# Altium PCB board.PcbDoc
Units mm, origin at the board's own origin, x right, y up, seen from the top; angles counter-clockwise.
Board outline 50 x 97 mm, 2 copper layers (Top Layer, Bottom Layer), stack 1.57 mm thick; 86 components, 61 nets, 299 pads, 30 vias.
Unrouted connection lines stored in the file: 2.
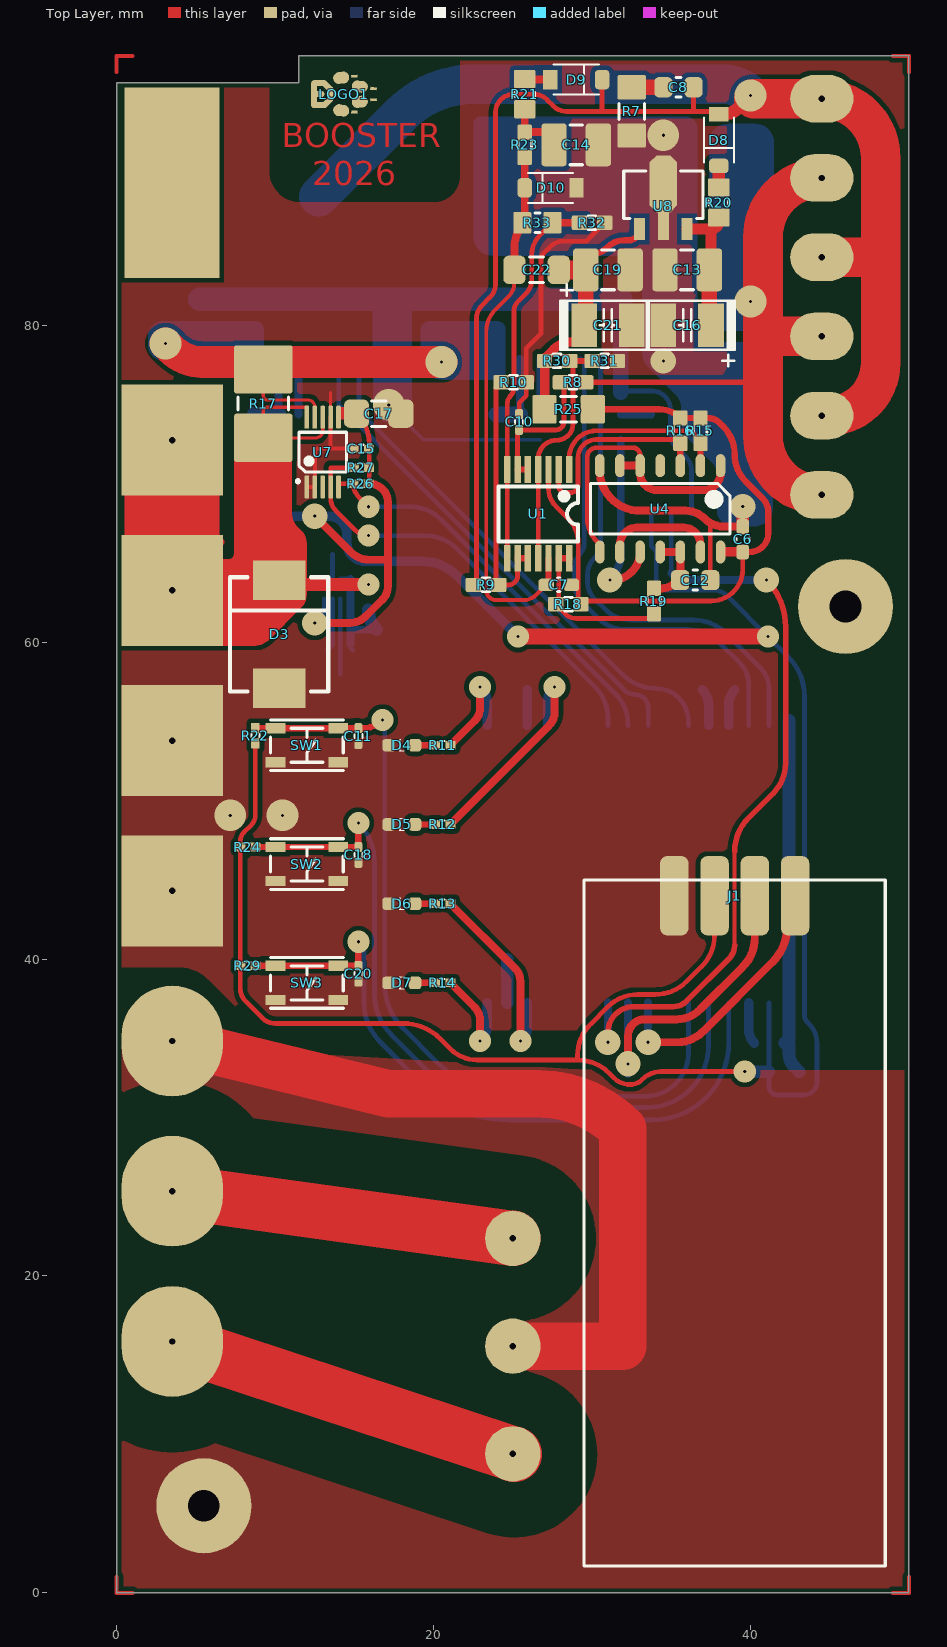
[diagram p0: Top Layer view]
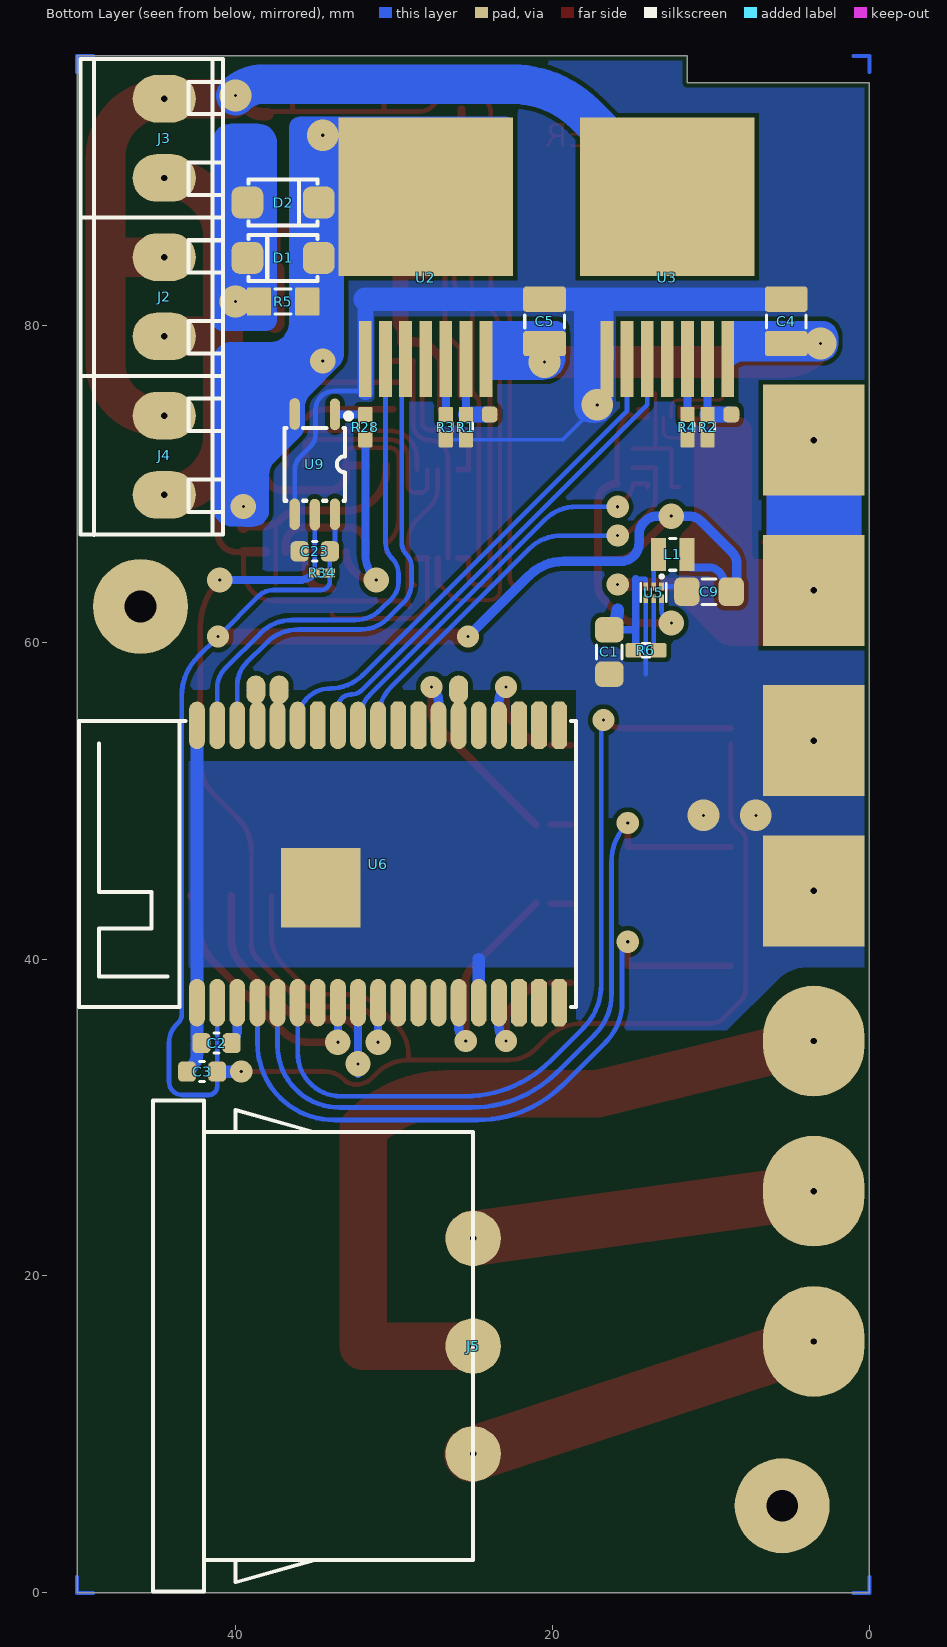
[diagram p1: Bottom Layer view, seen from below]
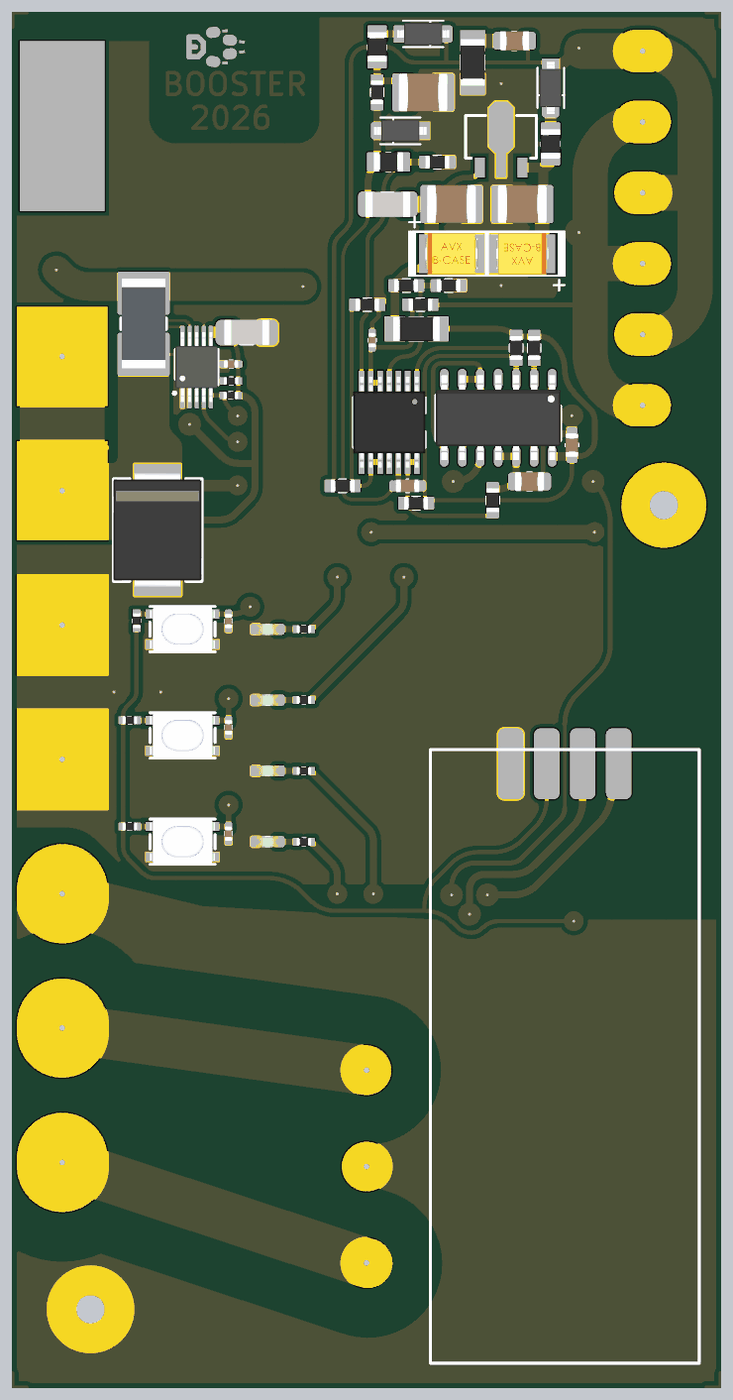
[diagram p2: 3D render of the assembled board from above, using the file's embedded part models]
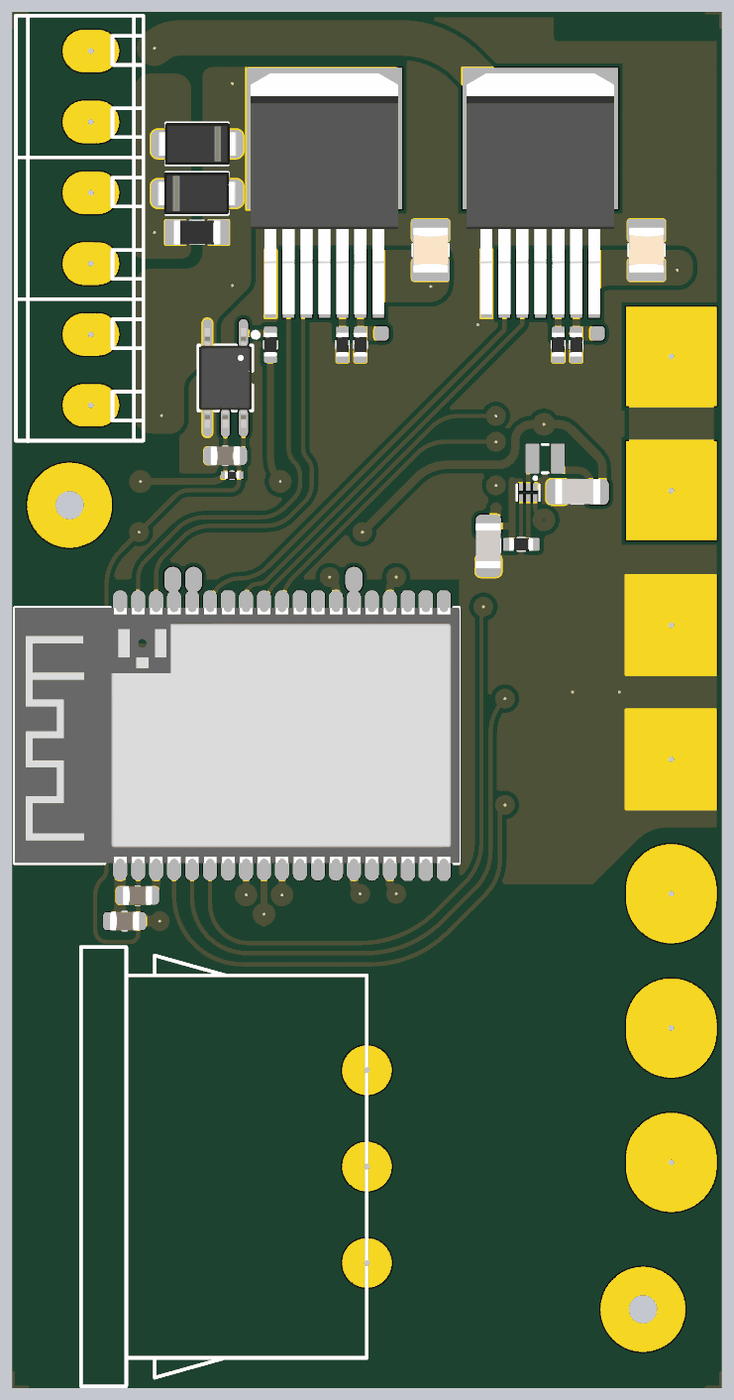
[diagram p3: 3D render of the assembled board from below, using the file's embedded part models]

## Layer stack, top to bottom
Top Solder: solder mask 0.0127, Solder Resist, Dk 3.8
Top Layer: signal copper 0.035
Dielectric: core 1.5, FR-4, Dk 4.5
Bottom Layer: signal copper 0.035
Bottom Solder: solder mask 0.0127, Solder Resist, Dk 3.8

## Board outline
0,0 50,0 50,97 11.5,97 11.5,95.3 0,95.3

## Design rules (kind name [scope] priority, off if disabled: settings)
AcuteAngle [All] p1: minimum=6.00000000000000E+0001 checktracksonly=FALSE
BoardOutlineClearance BoardOutlineClearance_1 [OnLayer('Top Overlay')    or OnLayer('Bottom Overlay')] p1: gap=0 ignorepadtopadclearanceinfootprint=FALSE
BoardOutlineClearance [All] p2: gap=0.3 ignorepadtopadclearanceinfootprint=FALSE
Clearance [InNet('L') or InNet('N')] p1: gap=2 ignorepadtopadclearanceinfootprint=FALSE except(3.5: Arc-Fill Arc-Poly Arc-Region Track-Fill Track-Poly Track-Region SMDPad-Fill SMDPad-Poly SMDPad-Region THPad-Fill THPad-Poly THPad-Region Via-Fill Via-Poly Via-Region Fill-Fill Fill-Poly Fill-Region Poly-Poly Poly-Region Region-Region)
Clearance Clearance_1 [All] p2: gap=0.3 ignorepadtopadclearanceinfootprint=FALSE except(0.13: Arc-Arc Arc-Track Arc-SMDPad Arc-Via Track-Track Track-SMDPad Track-Via SMDPad-SMDPad SMDPad-Via THPad-Via Via-Via; 0.15: Arc-THPad Arc-Text Arc-Hole Track-THPad Track-Text Track-Hole SMDPad-THPad SMDPad-Text SMDPad-Hole THPad-THPad THPad-Text THPad-Hole Via-Text Via-Hole Fill-Text Fill-Hole Poly-Text Poly-Hole Region-Text Region-Hole Text-Text Text-Hole)
ComponentClearance ComponentClearance_2 [HasFootprint('CONN-TH_XY300V-A-5.0-2P')] p1: gap=-1 collisioncheckmode=3 verticalgap=2540 showdistances=FALSE
ComponentClearance ComponentClearance_1 [IsFree] p2: gap=-1 collisioncheckmode=3 verticalgap=2540 showdistances=FALSE
ComponentClearance [All] p3: gap=0.3 collisioncheckmode=3 verticalgap=0.254 showdistances=FALSE donotcheckwithout3dbody=TRUE
Height Height_1 [HasFootprint('GME64128-02')] p1: minheight=0 maxheight=25.4 prefheight=12.7
Height [InComponentClass('Top Side Components')] p2: minheight=0 maxheight=4.36 prefheight=1
HoleSize [All] p1: absolutevalues=TRUE maxlimit=6 minlimit=0.2 maxpercent=80.000 minpercent=20.000
HoleToHoleClearance HoleToHoleClearance_1 [IsVia vs IsThruPin] p1: gap=0.7 allowstackedmicrovias=TRUE
HoleToHoleClearance [All] p2: gap=0.5 allowstackedmicrovias=TRUE
MinimumSolderMaskSliver [All] p1 off: minsoldermaskwidth=0.254
PlaneClearance [All] p1: clearance=0.45
PlaneConnect [All] p1: planeconnectstyle=Direct reliefexpansion=0.3 reliefentries=4 reliefconductorwidth=0.381 reliefairgap=0.178
PolygonConnect [All] p1: connectstyle=Direct reliefconductorwidth=0.381 reliefentries=4 polygonreliefangle="90 Angle" airgapwidth=0.356
RoutingVias [All] p1: holewidth=0.2 width=1.6 viastyle="Through Hole" minholewidth=0.2 minwidth=0.2 maxholewidth=3 maxwidth=3
SilkToSilkClearance [All] p1 off: silktosilkclearance=0.254
SilkToSolderMaskClearance [IsPad] p1 off: minsilkscreentomaskgap=0.254 clearancetoexposedcopper=TRUE
SolderMaskExpansion [All] p1: expansion=0.102 istentingtop=FALSE
SupplyNets "Schematic Supply Nets_10" [InNet('Vin0')] p1: voltage=0.000
SupplyNets "Schematic Supply Nets_9" [InNet('VGND')] p2: voltage=0.000
SupplyNets "Schematic Supply Nets_8" [InNet('OUT1')] p3: voltage=0.000
SupplyNets "Schematic Supply Nets_7" [InNet('+18mV')] p4: voltage=0.000
SupplyNets "Schematic Supply Nets_6" [InNet('V5V')] p5: voltage=0.000
SupplyNets "Schematic Supply Nets_5" [InNet('-18mV')] p6: voltage=0.000
SupplyNets "Schematic Supply Nets_4" [InNet('OUT2')] p7: voltage=0.000
SupplyNets "Schematic Supply Nets_2" [InNet('VNEG')] p8: voltage=0.000
SupplyNets "Schematic Supply Nets_3" [InNet('3V3')] p9: voltage=0.000
SupplyNets "Schematic Supply Nets_1" [InNet('GND')] p10: voltage=0.000
SupplyNets "Schematic Supply Nets" [InNet('Vin')] p11: voltage=0.000
UnRoutedNet [All] p1: checkbadconnections=TRUE
Width [All] p1: maxlimit=10 minlimit=0.15 preferedwidth=0.254
20 further rules are at their usual default settings.

## Classes and differential pairs
component class board: C1 C2 C3 C4 C5 C6 C7 C8 C9 C10 C11 C12 C13 C14 C15 C16 C18 C23 D1 D2 D3 D4 D5 D6 D7 D8 D9 D10 J1 J2 J3 J4 J5 L1 LOGO1 R1 R2 R3 R4 R5 R6 R7 R8 R9 R10 R11 R12 R13 R14 R15 R16 R17 R18 R19 R20 R21 R22 R23 R24 R25 R26 R27 R28 R29 R30 R31 R32 R33 R34 SW1 SW2 SW3 U1 U2 U3 U4 U5 U6 U7 U8 U9

## Components (designator, comment, footprint, x,y, rotation, side; value= is the part's Value field where it differs from the comment)
C1 "10uF" C1206#1 16.408,59.385 r90 bottom
C2 "1uF" C0805 41.2,34.7 r180 bottom
C3 "10uF" C0805 42.112,32.9 r180 bottom
C4 "4n7" C1210-2.5MM 5.25,80.25 r90 bottom
C5 "4n7" C1210-2.5MM 20.5,80.25 r90 bottom
C6 "100nF" C0603 39.507,66.494 r90 top
C7 "100nF" C0603 27.9,63.614 r180 top
C8 "10nF" C0805 35.452,95.024 r180 top
C9 "10uF" C1206#1 10.114,63.19 r180 bottom
C10 "100pF" C0402 25.4,73.9 r90 top
C11 "100nF" C0402 15.25,54.075 r270 top
C12 "1nF" C0805 36.509,63.923 r0 top
C13 "2u" C1210-1.8MM 36,83.5 r180 top
C14 "2u" C1210-1.8MM 29,91.388 r180 top
C15 "100nF" C0402 15.434,72.212 r180 top
C16 "2u" C3528 36,80 r180 top
C17 "100u" C1206#1 16.535,74.427 r0 top
C18 "100nF" C0402 15.25,46.575 r270 top
C19 "10u" C1210-1.8MM 31,83.5 r0 top
C20 "100nF" C0402 15.25,39.075 r270 top
C21 "2u" C3528 31,80 r0 top
C22 "10u" C1206#2 26.5,83.5 r180 top
C23 "10u" C0805 35,65.738 r0 bottom
D1 "SS36" SMA 37,84.25 r0 bottom
D2 "SS36" SMA 37,87.75 r180 bottom
D3 "" SMC 10.25,60.5 r270 top
D4 "GRN" LED-0603-GRN 18,53.5 r0 top
D5 "GRN" LED-0603-GRN 18,48.5 r0 top
D6 "GRN" LED-0603-GRN 18,43.5 r0 top
D7 "GRN" LED-0603-GRN 18,38.5 r0 top
D8 "1N4148WS" SOD-123 38,91.696 r90 top
D9 "1N4148WS" SOD-123 29,95.504 r180 top
D10 "1N4148WS" SOD-123 27.385,88.678 r0 top
J1 "OLED" GME64128-02 39,44 r0 top locked
J2 "" CONN-TH_XY300V-A-5.0-2P 44.5,81.8 r270 bottom
J3 "" CONN-TH_XY300V-A-5.0-2P 44.5,91.8 r270 bottom
J4 "" CONN-TH_XY300V-A-5.0-2P 44.5,71.8 r270 bottom
J5 "220V" AS-24 25,15.575 r0 bottom
L1 "33uH" L2520 12.409,65.537 r180 bottom
LOGO1 "LOGO" LOGO 12.465,94.59 r270 top
R1 "" R0603 25.46,73.577 r90 bottom
R2 "" R0603 10.21,73.577 r90 bottom
R3 "" R0603 26.73,73.577 r90 bottom
R4 "" R0603 11.48,73.577 r90 bottom
R5 "1.8" R1206 37,81.5 r0 bottom
R6 "0" R0603 14.097,59.487 r180 bottom
R7 "3.3" R1206 32.5,93.5 r270 top
R8 "100" R0603 28.801,76.4 r0 top
R9 "100k" R0603 23.308,63.614 r0 top
R10 "1k" R0603 25.05,76.4 r0 top
R11 "470" R0402 20.576,53.5 r0 top
R12 "470" R0402 20.576,48.5 r0 top
R13 "470" R0402 20.576,43.5 r0 top
R14 "470" R0402 20.576,38.5 r0 top
R15 "10k" R0603 36.84,73.35 r270 top
R16 "10k" R0603 35.57,73.35 r270 top
R17 "" R2512-WIDE 9.25,75.057 r270 top
R18 "10k" R0603 28.5,62.4 r180 top
R19 "470" R0603 33.907,62.6 r270 top
R20 "33" R0805 38,87.75 r270 top
R21 "220" R0805 25.75,94.59 r270 top
R22 "2k2" R0402 8.75,54.099 r270 top
R23 "220" R0603 25.75,91.388 r270 top
R24 "2k2" R0402 8.274,47.075 r180 top
R25 "0" R1206 28.524,74.7 r180 top
R26 "2k2" R0402 15.408,70.002 r0 top
R27 "2k2" R0402 15.434,71.018 r0 top
R28 "220" R0603 31.81,73.577 r270 bottom
R29 "2k2" R0402 8.274,39.575 r180 top
R30 "270k" R0603 27.8,77.749 r180 top
R31 "1k" R0603 30.8,77.749 r0 top
R32 "820" R0603 30,86.475 r0 top
R33 "33k" R0805 26.55,86.475 r180 top
R34 "1k" R0402 34.524,64.371 r0 bottom
SW1 "PTS810SJS250" BTN_PTS810 12,53.5 r0 top
SW2 "PTS810SJS250" BTN_PTS810 12,46 r0 top
SW3 "PTS810SJS250" BTN_PTS810 12,38.5 r0 top
U1 "LM2901YPT" TSSOP-14_L5.0-W4.4-P0.65-LS6.4-BL 26.6,68.1 r180 top
U2 "BTN8982TA" TO-263-7_L10.2-W10.4-P1.27-LS14.4-TL 28,83 r90 bottom
U3 "BTN8982TA" TO-263-7_L10.2-W10.4-P1.27-LS14.4-TL 12.75,83 r90 bottom
U4 "MC74HC02ADG" SOIC-14 34.3,68.419 r180 top value=MC74HC02
U5 "TPS62237" SON-6_L1.5-W1.0-P0.50-BL 13.614,63.135 r0 bottom
U6 "ESP32-WROVER-E-N16R8" WIFIM-SMD_39P-L31.4-W18.0-P1.27_2 31,46 r90 bottom
U7 "INA226AIDGSR" "VSSOP-10 (3x3x0.5)" 13,72 r0 top
U8 "7805" SOT-89 34.5,87.5 r0 top
U9 "TLP2362(TPL,E" OPTO-SMD-5_L3.7-W4.6-P1.27-LS7.0-BR 35,71.228 r90 bottom

## Footprints (in the part's own frame and the unit in brackets; to place one, negate y for a bottom-side part, rotate by r counter-clockwise, add the part's x,y. Pads: shape width x height; smd on the part's side, far side on the other; paste and mask are expansions set on the pad)
AS-24 [mm]
  round 3.5 hole 0.4: 1(0,6.8) 2(0,0) 3(0,-6.8)
  silkscreen extent 0,-15.5 20.2,15.5, body extent 0,-15.5 20.2,15.5, height 20
BTN_PTS810 [mm]
  rect 1.25x0.65 smd mask+0.05: 1(-1.975,1.075) 2(1.975,1.075) 3(-1.975,-1.075) 4(1.975,-1.075)
  silkscreen extent -2.3,-1.6 2.3,1.6, body extent -2.3,-1.6 2.3,1.6, height 2.5
C0402 [mm] "Chip Capacitor Body"
  rrect50% 0.635x0.508 smd mask+0.05: 1(-0.5,0) 2(0.5,0)
  silkscreen extent -0.13,-0.25 0.13,0.25, body extent -0.52,-0.27 0.53,0.28, height 0.55
C0603 [mil] "Chip Capacitor"
  rrect50% 38x31 smd mask+1.97: 1(-31.5,0) 2(31.5,0)
  silkscreen extent -3,-17 3,17, body extent -33,-18 33,18, height 35
C0805 [mil] "Chip Capacitor"
  rrect50% 45x50 smd mask+1.97: 1(-37.5,0) 2(37.5,0)
  silkscreen extent -6,-25 6,25, body extent -41,-27 41,27, height 53
C1206#1 [mm] "Chip Capacitor"
  rrect50% 1.6x1.8 smd: 1(-1.4,0) 2(1.4,0)
  silkscreen extent -0.45,-0.8 0.45,0.8, body extent -1.6,-0.88 1.6,0.92, height 1.6
C1206#2 [mm] "Chip Capacitor"
  rrect50% 1.4x1.8 smd: 1(-1.4,0) 2(1.4,0)
  silkscreen extent -0.45,-0.8 0.45,0.8, body extent -1.6,-0.88 1.6,0.92, height 1.6
C1210-1.8MM [mm] "Chip Capacitor"
  rrect25% 1.6x2.7 smd mask+0.05: 1(-1.4,0) 2(1.4,0)
  silkscreen extent -0.4,-1.25 0.4,1.25, body extent -1.75,-1.35 1.75,1.35, height 1.8
C1210-2.5MM [mm] "Chip Capacitor"
  rrect25% 1.6x2.7 smd mask+0.05: 1(-1.4,0) 2(1.4,0)
  silkscreen extent -0.4,-1.25 0.4,1.25, body extent -1.6,-1.25 1.6,1.25, height 2.52
C3528 [mil] "C3528_1"
  rect 64x108 smd: 1(-59.06,0) 2(59.06,0)
  silkscreen extent -118,-61 101,102, body extent -73,-58 73,58, height 80
CONN-TH_XY300V-A-5.0-2P [mm]
  oval 3x4 hole 0.4: 1(-2.5,0) 2(2.5,0)
  silkscreen extent -5,-5.3 5.05,3.7, body extent -5,-5.3 5,3.7, height 12.5
GME64128-02 [mm]
  rrect50% 1.8x5 smd: 1(-3.81,0) 2(-1.27,0) 3(1.27,0) 4(3.81,0)
  silkscreen extent -9.5,-42.3 9.5,1, body extent -9.5,-42.3 9.5,1, height 5.27
L2520 [mm] "Chip Inductor"
  rrect10% 0.95x2.1 smd mask+0.05: 1(-0.9,0) 2(0.9,0)
  silkscreen extent -0.2,-1 0.2,1, body extent -1.25,-1 1.25,1, height 0.9
LED-0603-GRN [mm]
  rrect50% 0.8x0.8 smd mask+0.05: 1(0.825,0) 2(-0.825,0)
  silkscreen extent -0.18,-0.4 0.2,0.4, body extent -0.8,-0.4 0.8,0.4, height 0.6
LOGO [mil]
  rect 15.75x7.87 smd rot 93 mask+4: ""(-44.55,100)
  oval 30x40 smd rot 8 mask+4: ""(-40.55,67)
  oval 15x39.5 smd mask+4: ""(-27.5,12.5) ""(27.5,12.5)
  oval 15x36.21 smd rot 135 mask+4: ""(-20,32.5)
  oval 30x40 smd rot 173 mask+4: ""(-18.99,113.27)
  rect 15.75x7.87 smd rot 83 mask+4: ""(-13.91,147.15)
  oval 39.5x15 smd mask+4: ""(0,40)
  oval 15x32.5 smd mask+4: ""(0,9)
  oval 70x15 smd mask+4: ""(0,0)
  rect 15.75x7.87 smd rot 97 mask+4: ""(13.91,147.15)
  oval 30x40 smd rot 7 mask+4: ""(18.99,113.27)
  oval 15x36.21 smd rot 45 mask+4: ""(20,32.5)
  oval 30x40 smd rot 172 mask+4: ""(40.55,67)
  rect 15.75x7.87 smd rot 87 mask+4: ""(44.55,100)
OPTO-SMD-5_L3.7-W4.6-P1.27-LS7.0-BR [mm]
  oval 2x0.65 smd: 1(3.15,-1.27) 3(3.175,1.27) 4(-3.15,1.27) 5(-3.175,0) 6(-3.15,-1.27)
  silkscreen extent -2.3,-2.29 3.2,1.9, body extent -3.5,-1.85 3.5,1.85, height 2.2
R0402 [mm]
  rrect10% 0.635x0.55 smd mask+0.05: 1(-0.476,0) 2(0.476,0)
  silkscreen extent -0.12,-0.25 0.13,0.25, body extent -0.52,-0.27 0.53,0.28, height 0.4
R0603 [mil] "Chip Resistor; Body 1.6 x 0.8 mm (LxW typ)"
  rrect20% 38x35.43 smd mask+1.97: 1(-31.5,0) 2(31.5,0)
  silkscreen extent -10,-17 10,17, body extent -33,-18 33,18, height 22
R0805 [mil] "Chip Resistor; Body 1.6 x 0.8 mm (LxW typ)"
  rrect15% 45x53.15 smd: 1(-37.5,0) 2(37.5,0)
  silkscreen extent -6,-25 6,25, body extent -41,-27 41,27, height 24
R1206 [mil] "Chip Resistor"
  rrect10% 60x70 smd mask+1.97: 1(-60,0) 2(60,0)
  silkscreen extent -20,-31 20,31, body extent -65,-33 65,33, height 26
R2512-WIDE [mm] "Chip Resistor; Body 6.4 x 3.2 mm (LxW typ)"
  rrect10% 3.05x3.68 smd mask+0.05: 1(-2.16,0) 2(2.16,0)
  silkscreen extent -0.4,-1.6 0.4,1.6, body extent -3.19,-1.55 3.16,1.55, height 0.55
SMA [mm] "SMA(DO-214AC)"
  rrect50% 2x2 smd: 1(-2.25,0) 2(2.25,0)
  silkscreen extent -2.17,-1.45 2.17,1.45, body extent -2.78,-1.48 2.83,1.48, height 2.9
SMC [mm]
  rect 2.5x3.3 smd: 1(3.4,0) 2(-3.4,0)
  silkscreen extent -3.6,-3.1 3.6,3.1, body extent -4.07,-3.15 4.08,3.1, height 2.65
SOD-123 [mm]
  rect 0.91x1.22 smd mask+0.05: 1(1.635,0)
  rrect50% 0.91x1.22 smd mask+0.05: 2(-1.635,0)
  silkscreen extent -1.43,-0.95 1.43,0.92, body extent -1.85,-0.77 1.85,0.77, height 1.44
SOIC-14 [mm]
  oval 0.6x1.45 smd: 1(-3.81,-2.725) 2(-2.54,-2.725) 3(-1.27,-2.725) 4(0,-2.725) 5(1.27,-2.725) 6(2.54,-2.725) 7(3.81,-2.725) 8(3.81,2.725) 9(2.54,2.725) 10(1.27,2.725) 11(0,2.725) 12(-1.27,2.725) 13(-2.54,2.725) 14(-3.81,2.725)
  silkscreen extent -4.4,-1.6 4.4,1.6, body extent -4.4,-3 4.4,3, height 1.75
SON-6_L1.5-W1.0-P0.50-BL [mm]
  rect 0.3x0.52 smd: 1(-0.5,-0.385) 2(0,-0.385) 3(0.5,-0.385) 4(0.5,0.385) 5(0,0.385) 6(-0.5,0.385)
  silkscreen extent -0.8,-1.12 0.8,0.58
SOT-89 [mm] "SOT-89; Body 4.7 x 4.5 mm, inc. leads (LxW max)"
  rect 0.7x1.4 smd: 1(-1.5,-1.425) 3(1.5,-1.425)
  rect 0.7x1.75 smd: 2(0,-1.25)
  oct 1.75x3.6 smd: 2(0,1.425)
  silkscreen extent -2.5,-0.75 2.5,2.25, body extent -2.25,-0.6 2.25,1.85, height 1.5
TO-263-7_L10.2-W10.4-P1.27-LS14.4-TL [mm]
  rect 4.8x0.8 smd: 1(-5.123,3.81) 2(-5.123,2.54) 3(-5.123,1.27) 4(-5.123,0) 5(-5.123,-1.27) 6(-5.123,-2.54) 7(-5.123,-3.81)
  rect 10x11 smd: 8(5.123,0)
  body extent -7.26,-5.21 9.71,5.21, height 5.28
TSSOP-14_L5.0-W4.4-P0.65-LS6.4-BL [mm]
  rect 0.4x1.7 smd: 1(-1.95,-2.8) 2(-1.3,-2.8) 3(-0.65,-2.8) 4(0,-2.8) 5(0.65,-2.8) 6(1.3,-2.8) 7(1.95,-2.8) 8(1.95,2.8) 9(1.3,2.8) 10(0.65,2.8) 11(0,2.8) 12(-0.65,2.8) 13(-1.3,2.8) 14(-1.95,2.8)
  silkscreen extent -2.51,-1.74 2.5,1.74, body extent -2.55,-3.2 2.55,3.2, height 1.2
"VSSOP-10 (3x3x0.5)" [mm]
  rrect50% 0.3x1.45 smd mask+0.05: 1(-1,-2.2) 2(-0.5,-2.2) 3(0,-2.2) 4(0.5,-2.2) 5(1,-2.2) 6(1,2.2) 7(0.5,2.2) 8(0,2.2) 9(-0.5,2.2) 10(-1,2.2)
  silkscreen extent -1.61,-1.88 1.5,1.25, body extent -1.5,-2.46 1.5,2.46, height 1.1
WIFIM-SMD_39P-L31.4-W18.0-P1.27_2 [mm]
  oval 3x1 smd paste+0 mask+0.051: 1(-8.75,11.43) 2(-8.75,10.16) 3(-8.75,8.89) 4(-8.75,7.62) 5(-8.75,6.35) 6(-8.75,5.08) 7(-8.75,3.81) 8(-8.75,2.54) 9(-8.75,1.27) 10(-8.75,0) 11(-8.75,-1.27) 12(-8.75,-2.54) 13(-8.75,-3.81) 14(-8.75,-5.08) 15(-8.75,-6.35) 16(-8.75,-7.62) 23(8.75,-7.62) 24(8.75,-6.35) 25(8.75,-5.08) 26(8.75,-3.81) 29(8.75,0) 30(8.75,1.27) 31(8.75,2.54) 33(8.75,5.08) 34(8.75,6.35) 35(8.75,7.62) 36(8.75,8.89) 37(8.75,10.16) 38(8.75,11.43)
  oct 3x1 smd paste+0 mask+0.051: 17(-8.75,-8.89) 18(-8.75,-10.16) 19(-8.75,-11.43) 20(8.75,-11.43) 21(8.75,-10.16) 22(8.75,-8.89) 27(8.75,-2.54) 28(8.75,-1.27) 32(8.75,3.81)
  rect 5x5 smd paste+0 mask+0.051: 39(-1.5,3.62)
  silkscreen extent -9.02,-12.48 9.02,18.89, body extent -9,-12.54 9,18.86, height 3.31

## Part data
C1 C9: library part CAP, "10uf 50V 1206"
C2: library part Cap
C3 C8 C10 C11 C12 C13 C14 C15 C17 C18 C19 C20 C22 C23: library part CAP
C4 C5: library part CAP, "4n7 0402"
C6 C7: library part CAP, "100nF 0402"
C16 C21: library part CAP, "B"
D1 D2 D3 D8 D9: library part NCP51460SN33T1G, LCSC part number=C693617, P/N=SMCJ24A
D4 D5 D6 D7: library part LED-0603-GREEN, "LED 0603 GRN", LCSC part number=C434420, P/N=SZYY0603G
D10: library part NCP51460SN33T1G, "1N4148", LCSC part number=C693617, P/N=SMCJ24A
J1: library part "Header 8"
J2 J3 J4: library part "Header 2"
J5: library part "Header 5"
L1: library part 4.7uH, LCSC part number=C167208, P/N=FXL0420-4R7-M
R1 R2 R3 R4 R6: library part RES
R5 R7 R8 R9 R10 R11 R12 R13 R14 R15 R16 R17 R18 R19 R20 R21 R22 R23 R24 R25 R26 R27 R28 R29 R30 R31 R32 R33 R34: library part RES, LCSC part number=C138044, P/N=RC0402FR-0718KL
SW1 SW2 SW3: library part Component_1, LCSC part number=C221896, P/N=PTS810SJK250SMTRLFS
U1: Ib - Input Bias Current=25nA, Input Hysteresis Voltage (Vhys)=-, Input Offset Current(Ios)=5nA, JLCPCB Part Class="Extended Part", LCSC Part Name=低功耗四电压比较器, Manufacturer=ST(意法半导体), Maximum Power Supply Range (Vdd-Vss)=36V, Operating Temperature=-40℃~+125℃, Quiescent Current=1.1mA, Vos - Input Offset Voltage=1mV, Add into BOM=yes, Common Mode Rejection Ratio(CMRR)=-, Convert to PCB=yes, Datasheet=https://item.szlcsc.com/datasheet/LM2901YPT/174926.html, Device=LM2901YPT, Dual Supply=1V~18V；-18V~-1V, Manufacturer Part=LM2901YPT, Number of Channels=4, Output Mode=MOS；DTL；CMOS；TTL；ECL, Output Type=-, Propagation Delay Time=1.3us, Response Time (tr)=1.3us, Single Supply=2V~36V, Supplier=LCSC, Supplier Footprint=TSSOP-14, Supplier Part=C163544, Symbol=LM2901YPT
U2 U3: JLCPCB Part Class="Extended Part", Manufacturer=Infineon(英飞凌), Add into BOM=yes, Convert to PCB=yes, Datasheet=https://item.szlcsc.com/datasheet/BTN8982TA/75294.html, Device=BTN8982TA, LCSC Part Name=BTN8982TA, Manufacturer Part=BTN8982TA, Supplier=LCSC, Supplier Footprint=TO-263-7, Supplier Part=C74175, Symbol=BTN8982TAAUMA1
U4: "Logic Quad 2-Input NOR Gates", ComponentLink2Description=Datasheet, ComponentLink2URL=http://www.ti.com/lit/ds/symlink/cd74hc02.pdf, PN=MC74HC02ADG
U6: JLCPCB Part Class="Extended Part", LCSC Part Name="通用型Wi-Fi+BT+BLE MCU模组", Manufacturer=ESPRESSIF(乐鑫), Add into BOM=yes, Convert to PCB=yes, Datasheet=https://atta.szlcsc.com/upload/public/pdf/source/20241030/69A66968DE36EDB45130F1579BF46A5B.pdf, Device=ESP32-WROVER-E-N16R8, Manufacturer Part=ESP32-WROVER-E-N16R8, Supplier=LCSC, Supplier Footprint=SMD,18x31.4mm, Supplier Part=C529589, Symbol=ESP32-WROVER-E(16MB)
U7: Differential Voltage=-40V~+40V, Ib - Input Bias Current=10nA, Input Offset Current Drift (Ios TC)=-, Input Offset Voltage Drift(Vos TC)=0.1uV/℃, JLCPCB Part Class="Extended Part", LCSC Part Name=高侧/低侧测量双向电流/功率监视器，具有I²C兼容接口, Manufacturer=TI(德州仪器), Operating Temperature=-40℃~+125℃, Quiescent Current=330uA, Vcm - Common Mode Voltage=300mV~40V, Vos - Input Offset Voltage=2.5uV, Add into BOM=yes, Bandwidth=-, Common Mode Rejection Ratio (CMRR)=140dB, Convert to PCB=yes, Datasheet=https://item.szlcsc.com/datasheet/INA226AIDGSR/50860.html, Device=INA226AIDGSR, Dual Supply=-, Gain=-, Input Offset Current(Ios)=-, Manufacturer Part=INA226AIDGSR, Maximum Power Supply Range (Vdd-Vss)=-, Noise density(eN)=-, Number of Channels=-, Output current=-, Single Supply=2.7V~5.5V, Slew Rate=-, Supplier=LCSC, Supplier Footprint=VSOP-10, Supplier Part=C49851, Symbol=INA226AIDGSR
U8: library part Component_4_1, "XC6206P332MR"
U9: library part TLP2362(TPL,E_C37658, Forward Current(If)=14mA, Input threshold current=5mA, Isolation Voltage(Vrms)=3.75kV, JLCPCB Part Class="Extended Part", LCSC Part Name="DC输入 1通道 隔离电压(rms):3750V", Manufacturer=TOSHIBA(东芝), Operating Temperature=-40℃~+125℃, Output current=25mA, Output voltage=6V, power dissipation=60mW, Reverse Voltage=5V, Voltage - Forward(Vf)=1.55V, Voltage - Supply=2.7V~5.5V, Add into BOM=yes, CMTI(kV/us)=25kV/us, Convert to PCB=yes, Data rate=10Mbps, Datasheet=https://item.szlcsc.com/datasheet/TLP2362(TPL%252CE/38638.html, Device=TLP2362(TPL,E_C37658, High level Delay Time=100ns, Input Type=DC, Low level Delay Time=100ns, Manufacturer Part=TLP2362(TPL,E, Number of Channels=1, Supplier=LCSC, Supplier Footprint=SO-5, Supplier Part=C37658, Symbol=TLP2362(TPL,E(T

## Free pads (board coordinates)
  rrect50% 1x1 smd far side: 2(8.71,74.377) 2(23.96,74.377)
  oval 6.4x7 hole 0.4: E(3.5,34.83) L(3.5,15.87) N(3.5,25.35)
  rect 6.4x7 hole 0.4: L(3.5,44.31) L(3.5,53.79) L(3.5,63.27) L(3.5,72.75)
  rect 6x12 smd: M(3.5,89)
  round 6 hole 2: M(5.5,5.5) M(46,62.25)
  oval 1.2x1.8 smd far side: ""(25.92,57) ""(37.25,57) ""(38.72,57)

## Via types
v1: diameter 1.4, hole 0.2, Top Layer to Bottom Layer, tented both sides, 13 vias
v2: diameter 1.6, hole 0.2, Top Layer to Bottom Layer, tented both sides, 9 vias
v3: diameter 2, hole 0.2, Top Layer to Bottom Layer, tented both sides, 8 vias

## Nets (pads, with @x,y where several pads share a name; then routed paths per layer and width w, separated by ;. In a path a pad name is that pad's centre, name@x,y a point inside that pad or via, vN(x,y) a via of type N, cw(c..) or ccw(c..) an arc to the next point about the centre after c; other vN are vias at no path point)
3V3: C3.2 C9.2 C15.1 C17.1 C23.1 J1.2 L1.2 R22.2 R24.2 R26.2 R27.2 R29.2 R34.1 U5.6 U6.2 U7.6 U9.6 | length 188.4
  Top Layer w0.3: R22.2 8.75,49.098 cw(c7.838,49.098) 8.483,48.453 8.031,48.001 ccw(c8.592,47.439) 7.798,47.439 R24.2 R29.2 7.798,38.152 ccw(c8.966,38.152) 8.14,37.326 9.183,36.283 ccw(c10.009,37.109) 10.009,35.941 18.093,35.941 cw(c18.093,32.649) 20.421,34.977 21.083,34.314 ccw(c22.736,35.967) 22.736,33.63 29.084,33.63 ; U7.6 14.588,74.2 ccw(c14.588,74.974) C17.1 15.19,74.372 cw(c13.394,72.576) 15.934,72.576 C15.1 R26.2@15.934,70.003 ; U7.6@14,74.454 C17.1@14.588,74.454 ; U7.6@14,74.708 C17.1@14.588,74.708 ; R26.2 R26.2@15.934,70.003 ; R26.2@15.951,70.003 R26.2@15.934,70.003 ; J1.2 37.73,41.514 cw(c34.911,41.514) 36.904,39.52 35.979,38.596 cw(c33.986,40.589) 33.986,37.77 32.874,37.77 ccw(c32.874,35.118) 30.999,36.993 29.909,35.904 ccw(c31.903,33.91) 29.084,33.91 29.084,33.63 ; v1(39.636,32.9) 34.358,32.9 ccw(c34.358,31.22) 33.17,32.408 33.148,32.386 cw(c32.41,33.123) 32.41,32.08 cw(c32.41,33.552) 31.37,32.511 31.077,32.804 ccw(c29.084,30.81) 29.084,33.63
  Top Layer w0.5: v2(12.498,67.96) 14.755,65.703 ccw(c15.962,66.909) 15.962,65.203 17.12,65.203 ; v2@12.573,61.214 14.695,61.214 ccw(c14.695,62.66) 15.718,61.638 16.758,62.677 ccw(c15.884,63.551) 17.12,63.551 17.12,65.203 ; R26.2@15.951,70.003 cw(c15.951,68.834) 17.12,68.834 17.12,65.203
  Top Layer w1: v1(25.324,60.35) v1(41.1,60.35)
  Bottom Layer w0.3: v2@12.491,61.126 12.908,61.543 ccw(c12.411,62.041) 13.114,62.041 U5.6 ; U9.6 33.73,66.055 C23.1 R34.1 34.048,63.846 ccw(c34.596,63.846) 34.596,63.298 37.616,63.298 cw(c37.616,62.002) 38.532,62.918 v1(41.1,60.35) 42.382,59.068 cw(c39.925,56.611) 43.4,56.611 43.4,36.483 ccw(c44.083,36.483) 43.6,36 cw(c42.456,34.684) 44.2,34.684 44.2,32.259 cw(c43.366,32.259) 43.366,31.425 41.707,31.425 cw(c41.707,31.972) 41.16,31.972 C3.2 U6.2
  Bottom Layer w0.5: C9.2@9.203,63.781 cw(c10.143,63.781) 10.143,64.721 11.254,64.721 L1.2@11.557,65.024
  Bottom Layer w0.6: C9.2 8.699,63.206 cw(c9.525,64.032) 8.357,64.032 8.357,64.896 cw(c9.525,64.896) 8.699,65.722 10.595,67.618 cw(c11.421,66.791) 11.421,67.96 v2(12.498,67.96) 13.36,67.96 cw(c13.36,66.791) 14.529,66.791 14.529,66.269 ccw(c15.697,66.269) 15.697,65.1 19.303,65.1 cw(c19.303,62.031) 21.473,64.201 v1(25.324,60.35)
  Bottom Layer w0.8: v1(39.636,32.9) C3.2
  other v2: 12.497,61.214
+18mV: R30.1 R31.1 U1.4 U1.11 | length 14.9
  Top Layer w0.3: U1.11 U1.4 26.6,71.581 cw(c27.769,71.581) 27.769,72.75 ccw(c27.769,73.783) 28.801,73.783 R30.1@28.801,77.749
  Top Layer w0.4: R30.1@28.801,77.749 R31.1
-18mV: R32.1 R33.1 U1.7 U1.8 | length 23.8
  Top Layer w0.3: U1.8 U1.7 24.65,75.049 cw(c25.36,75.049) 24.857,75.55 ccw(c24.356,76.053) 25.066,76.053 25.066,80.86 cw(c26.01,80.86) 25.342,81.528 25.84,82.025 ccw(c24.973,82.891) 26.199,82.891 26.199,84.458 cw(c27.92,84.458) 26.703,85.675 R33.1
  Top Layer w0.5: R33.1 R32.1
ALERT: U6.13 U7.3
BTN0: C11.1 R22.1 SW1.1 SW1.2 U6.6 | length 52.2
  Top Layer w0.4: R22.1 SW1.1 SW1.2 C11.1 15.548,54.575 ccw(c15.548,56.309) v1(16.774,55.083)
  Bottom Layer w0.3: v1(16.774,55.083) 16.917,54.94 16.917,38.412 ccw(c20.859,38.412) 18.071,35.624 20.112,33.584 ccw(c25.52,38.992) 25.52,31.344 33.343,31.344 ccw(c33.343,34.081) 36.08,34.081 U6.6
BTN1: C18.1 R24.1 SW2.1 SW2.2 U6.5 | length 48.5
  Top Layer w0.4: R24.1 SW2.1 SW2.2 C18.1 v1(15.25,48.599)
  Bottom Layer w0.3: v1(15.25,48.599) cw(c12.783,46.132) 16.272,46.132 16.272,37.774 ccw(c19.814,37.774) 17.309,35.269 19.705,32.873 ccw(c25.114,38.281) 25.114,30.632 33.441,30.632 ccw(c33.441,34.542) 37.35,34.542 U6.5
BTN2: C20.1 R29.1 SW3.1 SW3.2 U6.4 | length 43.8
  Top Layer w0.4: R29.1 SW3.1 SW3.2 C20.1 v1(15.25,41.099)
  Bottom Layer w0.3: v1(15.25,41.099) 15.604,40.745 15.604,37.237 ccw(c19.059,37.237) 16.616,34.793 19.324,32.085 ccw(c24.733,37.493) 24.733,29.845 33.774,29.845 ccw(c33.774,34.691) 38.62,34.691 U6.4
DSCL: J1.3 U6.9 | length 20.1
  Top Layer w0.5: v2(32.27,33.385) 32.27,35.153 cw(c33.313,35.153) 33.313,36.196 35.323,36.196 ccw(c35.323,38.302) 36.813,36.813 39.509,39.509 ccw(c37.67,41.347) 40.27,41.347 J1.3
  Bottom Layer w0.5: v2@32.27,32.75 v2(32.27,33.385) U6.9
DSDA: J1.4 U6.8 | length 17
  Top Layer w0.5: v2(33.54,34.75) 35.376,34.75 ccw(c35.376,37.044) 36.998,35.422 41.379,39.803 ccw(c39.119,42.063) 42.315,42.063 42.315,43.505 J1.4
  Bottom Layer w0.5: v2(33.54,34.75) U6.8
E: J5.2 pad.E pad.M@5.5,5.5 | length 50.1
  Top Layer w3: pad.E 17.145,31.496 26.574,31.496 cw(c26.574,23.925) 31.928,29.278 31.928,15.575 J5.2
EN: C2.2 U6.3 | length 2.6
  Bottom Layer w0.6: U6.3 39.89,35.541 ccw(c41.058,35.541) 40.232,34.715 C2.2
ESP_PRG: pad.@25.92,57 U6.25 | length 2.3
  Bottom Layer w0.6: U6.25 pad.@25.92,57
GND: C1.1 C2.1 C3.1 C4.2 C5.2 C9.1 C11.2 C15.2 C17.2 C18.2 C20.2 C23.2 D3.1 D4.2 D5.2 D6.2 D7.2 J1.1 pad.L@3.5,44.31 pad.L@3.5,53.79 R1.1 R2.1 R3.1 R4.1 SW1.3 SW1.4 SW2.3 SW2.4 SW3.3 SW3.4 U2.1 U3.1 U5.1 U5.4 U6.1 U6.15 U6.38 U6.39 U7.1 U7.2 U7.7 U9.4 | length 98.8
  Top Layer w0.2: U7.7 13.5,75.768
  Top Layer w0.25: U7.1 U7.2 12.5,72.212 13.5,72.212 ; U7.7 13.5,72.212 ; C15.2 13.5,72.212
  Bottom Layer w0.25: v3(17.17,74.981) 19.374,72.777 R1.1 R3.1
  Bottom Layer w0.3: C9.1 cw(c11.845,63.19) 11.845,63.52 U5.1 ; 14.114,57.985 U5.4 ; U2.1@31.81,75.853 33.782,75.853 cw(c33.782,74.685) 34.95,74.685 34.95,73.151 ccw(c36.119,73.151) 35.293,72.325 35.928,71.69 cw(c35.101,70.864) 36.27,70.864 U9.4
  Bottom Layer w0.8: U6.15 24.65,40 ; C2.1 42.43,34.977 U6.1 U6.38@42.43,55.057 ; C2.1@42.43,34.7 42.43,34.019 ccw(c43.598,34.019) 42.772,33.193 C3.1
  Bottom Layer w1: pad.L@3.5,44.31 pad.L@3.94,44.75 ; U3.1@16.64,77.958 16.64,81.65 ; U2.1@31.81,75.784 31.81,75.853 U2.1 31.81,81.65
  Bottom Layer w1.5: C4.2 16.64,81.65 C5.2 31.81,81.65
  other v3: 7.163,49.073 10.465,49.073
IN1: U2.2 U6.37 | length 31.3
  Bottom Layer w0.3: 30.129,65.297 ccw(c31.12,64.308) 29.72,64.308 29.72,63.779 ccw(c31.165,63.779) 30.143,62.757 30.822,62.078 ; 30.131,65.298 ccw(c29.14,66.288) 30.54,66.288 U2.2 ; 30.822,62.078 ccw(c32.459,63.716) 32.459,61.4 36.432,61.4 cw(c36.432,58.581) 38.425,60.575 ; 38.426,60.574 40.636,58.364 cw(c39.372,57.099) 41.16,57.099 U6.37
IN2: U3.2 U6.33 | length 32.6
  Bottom Layer w0.3: U3.2 15.29,74.614 31.981,57.923 ccw(c34.008,59.949) 34.008,57.084 cw(c34.008,55.008) 36.083,54.956 U6.33
INH1: U2.3 U6.36 | length 31.1
  Bottom Layer w0.3: 29.2,65.514 ccw(c29.943,64.772) 28.893,64.772 28.893,63.745 ccw(c30.674,63.745) 29.415,62.485 30.4,61.5 ccw(c32.09,63.19) 32.09,60.8 36.043,60.8 cw(c36.043,57.981) 38.036,59.975 39.311,58.7 cw(c37.914,57.302) 39.89,57.302 U6.36 ; 29.201,65.514 ccw(c28.458,66.257) 29.508,66.257 29.508,77.639 U2.3
INH2: U3.3 U6.31 | length 31.5
  Bottom Layer w0.3: U3.3 14.02,74.984 32.018,56.986 ccw(c32.713,57.681) 32.713,56.698 cw(c32.713,55.871) 33.54,55.871 U6.31
L: J5.1 pad.L@3.5,15.87 | length 22.7
  Top Layer w3.5: pad.L@3.5,15.87 J5.1 J5.1@25.084,8.752
LED0: R11.2 U6.23 | length 7
  Top Layer w0.5: R11.2 22.593,55.041 ccw(c21.766,55.867) 22.935,55.867 v1(22.935,57.175)
  Bottom Layer w0.6: v1(22.935,57.175) 23.038,57.072 cw(c22.212,56.246) 23.38,56.246 U6.23
LED1: R12.2 U6.26 | length 13.9
  Top Layer w0.5: R12.2 27.293,54.741 ccw(c26.467,55.567) 27.635,55.567 v1(27.635,57.175)
  Bottom Layer w0.6: U6.26 27.19,56.246 cw(c28.358,56.246) 27.532,57.072 v1(27.635,57.175)
LED2: R13.2 U6.14 | length 13
  Top Layer w0.5: R13.2 25.133,39.419 cw(c24.306,38.593) 25.475,38.593 v1(25.475,34.825)
  Bottom Layer w0.6: v1(25.475,34.825) 25.578,34.928 ccw(c24.752,35.754) 25.92,35.754 U6.14
LED3: R14.2 U6.16 | length 7
  Top Layer w0.5: R14.2 22.593,36.959 cw(c21.766,36.133) 22.935,36.133 v1(22.935,34.825)
  Bottom Layer w0.6: v1(22.935,34.825) 23.038,34.928 ccw(c22.212,35.754) 23.38,35.754 U6.16
N: J5.3 pad.N | length 21.7
  Top Layer w3.5: pad.N J5.3
NetC1_2: C1.2 R6.1 U5.3 | length 8.7
  Bottom Layer w0.3: U5.3 14.114,63.989 14.742,63.989 ; R6.1@14.742,59.862 ccw(c15.272,59.862) R6.1
  Bottom Layer w0.5: R6.1@14.742,59.862 14.742,60.785 ; 14.742,63.989 14.742,60.785 ; C1.2 14.742,60.785
  Bottom Layer w0.8: 15.884,62.051 ccw(c17.674,62.051) C1.2
NetC8_2: C8.2 R7.1 | length 2
  Top Layer w1: R7.1 C8.2
NetC10_1: C10.1 R8.1 U1.5 U1.6 | length 8.9
  Top Layer w0.3: U1.6 25.3,73.3 C10.1 27.725,73.4 ccw(c27.725,73.9) 28.225,73.9 R8.1@28.225,76.406 ; R8.1 R8.1@28.098,76.302
  Top Layer w0.4: U1.6 U1.5
NetC12_1: C12.1 R19.1 U4.11 U4.12 | length 4.7
  Top Layer w0.5: R19.1 34.401,63.4 ccw(c34.401,64.568) 35.57,64.568 U4.12 U4.11
NetC13_1: C13.1 C16.1 R20.2 U8.3 | length 8.8
  Top Layer w0.7: U8.3 37.5,86.075 ; C13.1 C13.1@37.5,83.4 ; C13.1@37.5,83.5 37.5,86.075 ; R20.2 38,86.575 cw(c37.5,86.575) 37.5,86.075
  Top Layer w1: C13.1 37.4,80.1 C16.1
NetC14_2: C14.2 R21.2 R23.1 | length 4.1
  Top Layer w0.5: R21.2 R23.1 27.6,92.188 C14.2
NetD4_1: D4.1 R11.1 | length 1.3
  Top Layer w0.4: D4.1 R11.1
NetD5_1: D5.1 R12.1 | length 1.3
  Top Layer w0.4: D5.1 R12.1
NetD6_1: D6.1 R13.1 | length 1.3
  Top Layer w0.4: D6.1 R13.1
NetD7_1: D7.1 R14.1 | length 1.3
  Top Layer w0.4: D7.1 R14.1
NetD8_2: D8.2 R20.1 | length 1.4
  Top Layer w0.8: R20.1 D8.2
NetD9_1: D9.1 R21.1 | length 1.6
  Top Layer w0.5: R21.1@25.75,95.504 D9.1
NetL1_1: L1.1 U5.2 | length 2
  Bottom Layer w0.3: U5.2 L1.1@13.614,65.537
NetR1_2: pad.2@23.96,74.377 R1.2 U2.6 | length 5
  Bottom Layer w0.5: R1.2 U2.6
  Bottom Layer w1: pad.2@23.96,74.377 R1.2
NetR2_2: pad.2@8.71,74.377 R2.2 U3.6 | length 5
  Bottom Layer w0.5: R2.2 U3.6
  Bottom Layer w1: pad.2@8.71,74.377 R2.2
NetR3_2: R3.2 U2.5 | length 3.5
  Bottom Layer w0.5: R3.2 U2.5
NetR4_2: R4.2 U3.5 | length 3.5
  Bottom Layer w0.5: R4.2 U3.5
NetR6_2: R6.2 U5.5 | length 3.4
  Bottom Layer w0.3: R6.2 13.614,59.804 U5.5
NetR9_2: R9.2 R10.1 U1.9 U1.10 | length 16.2
  Top Layer w0.3: R10.1 23.944,76.095 23.944,64.01 ccw(c24.504,64.01) R9.2 24.715,63.614 ccw(c24.715,64.199) 25.3,64.199 U1.9
  Top Layer w0.4: U1.9 U1.10
NetR15_2: R15.2 U1.1 U4.2 | length 11.8
  Top Layer w0.3: U1.1 28.55,71.605 cw(c30.295,71.605) 30.295,73.35 35.989,73.35 cw(c35.989,72.853) 36.341,73.204 36.84,72.706 R15.2
  Top Layer w0.4: U4.2 R15.2
NetR16_2: R16.2 U1.2 U4.3 | length 13.1
  Top Layer w0.3: U1.2 27.9,69.84 ccw(c28.292,69.84) 28.292,69.448 28.661,69.448 ccw(c28.661,69.901) 29.114,69.901 29.114,71.637 cw(c30.267,71.637) 30.267,72.789 35.331,72.789 R16.2
  Top Layer w0.4: U4.3 R16.2
NetR18_2: R18.2 R19.2 U1.13 U1.14 | length 10.3
  Top Layer w0.3: R18.2 27.8,62.3 28.303,61.797 ccw(c29.02,62.513) 29.02,61.5 33.607,61.5 ccw(c33.607,61.8) R19.2 ; R18.2@27.9,62.4 U1.13
  Top Layer w0.4: U1.13 U1.14
NetR28_1: R28.1 U9.1 | length 1.9
  Bottom Layer w0.5: R28.1 U9.1
NetR28_2: R28.2 U4.10 | length 11.9
  Top Layer w0.5: v2(31.125,63.927) 31.262,63.927 ccw(c31.262,65.694) U4.10
  Bottom Layer w0.5: v2(31.125,63.927) ccw(c29.47,65.582) 31.81,65.582 R28.2
NetU4_1: U4.1 U4.5 U4.6 U4.8 | length 19.3
  Top Layer w0.3: U4.8 30.49,66.172 30.297,66.365 cw(c31.728,67.796) 29.704,67.796 29.704,71.7 cw(c30.279,71.7) 30.279,72.275 32.564,72.275 cw(c32.564,71.81) 33.03,71.81 U4.5
  Top Layer w0.5: U4.6 U4.5 33.03,70.67 ccw(c34.1,70.67) 34.1,69.6 37.039,69.6 ccw(c37.039,70.67) 38.11,70.67 U4.1
NetU4_9: U4.9 U4.13 | length 7.2
  Top Layer w0.5: U4.9 31.76,66.168 cw(c32.83,66.168) 32.83,67.239 35.769,67.239 cw(c35.769,66.168) 36.84,66.168 U4.13
OUT1: C8.1 D8.1 D9.2 J2.1 J3.1 J4.1 R9.1 U3.8 | length 113.9
  Top Layer w0.3: R9.1 ccw(c22.045,64.077) 22.7,64.077 22.7,80.416 cw(c23.868,80.416) 23.042,81.242 23.558,81.758 ccw(c22.732,82.584) 23.9,82.584 23.9,93.421 cw(c25.068,93.421) 25.068,94.59 26.326,94.59 cw(c26.326,93.421) 27.153,94.247 27.558,93.842 ccw(c28.384,94.668) 28.384,93.5 30.635,93.5 ; D9.2 30.635,93.5 ; C8.1 36.405,93.5 ; D8.1@38,93.5 36.405,93.5 ; 30.635,93.5 36.405,93.5
  Top Layer w0.8: D8.1 38.347,93.331 ccw(c38.347,94.499) 39.173,93.673 v3(40,94.5)
  Top Layer w2.5: v3@40.2,94.3 J3.1 cw(c44.5,90.591) 48.209,90.591 48.209,84.3 ; J4.1 ccw(c44.885,77.602) 48.209,77.602 48.209,84.3 ; J2.1 48.209,84.3
  Bottom Layer w2.5: U3.8 17.921,93.294 cw(c22.584,88.631) 22.584,95.225 38.25,95.225 cw(c38.25,92.75) v3(40,94.5)
OUT2: D1.2 D2.1 J2.2 J3.2 J4.2 R5.2 R8.2 | length 39.3
  Top Layer w0.35: R8.2 41,76.4
  Top Layer w2.5: J4.2 cw(c44.5,73.009) 40.791,73.009 40.791,76.4 40.791,79.3 ; J2.2 40.791,79.3 ; J3.2 ccw(c44.5,85.591) 40.791,85.591 40.791,81.5 40.791,79.3
  other v3: 40,81.5
RXD: pad.@37.25,57 U6.34 | length 2.4
  Bottom Layer w0.6: pad.@36.95,57 cw(c35.984,56.034) 37.35,56.034 U6.34
SCL: R26.1 U6.30 U7.5 | length 25.5
  Top Layer w0.3: U7.5 14,70.003 R26.1 14.932,69.991 ccw(c16.101,69.991) 15.275,69.164 v1(15.884,68.555)
  Bottom Layer w0.3: v1(15.884,68.555) 18.492,68.555 cw(c18.492,65.735) 20.485,67.729 31.444,56.77 ; 31.445,56.769 cw(c29.451,54.776) 32.27,54.776 U6.30
SDA: R27.1 U6.29 U7.4 | length 27.7
  Top Layer w0.3: R27.1 13.5,71.019 U7.4 13.5,69.102 ccw(c14.668,69.102) 13.842,68.276 15.05,67.068 ccw(c15.876,67.894) 15.876,66.726 v1(15.884,66.726)
  Bottom Layer w0.3: v1(15.884,66.726) 19.466,66.726 cw(c19.466,63.906) 21.459,65.901 ; 21.46,65.9 30.174,57.186 ; 30.175,57.185 cw(c28.181,55.192) 31,55.192 U6.29
TXD: pad.@38.72,57 U6.35 | length 2.4
  Bottom Layer w0.6: U6.35 38.62,56.034 cw(c39.986,56.034) pad.@39.02,57
UART_DET: R34.2 U6.10 U9.5 | length 48.1
  Top Layer w0.25: 39,40.87 39,46.808
  Top Layer w0.35: v2(31,34.75) 31,35.36 cw(c32.64,35.36) 32.64,37 35.13,37 ccw(c35.13,38.168) 35.956,37.342 38.658,40.044 ccw(c37.832,40.87) 39,40.87 ; 39,46.808 cw(c41.958,46.808) 39.866,48.9 41.43,50.463 ccw(c39.534,52.359) 42.215,52.359 42.215,60.994 ccw(c38.067,60.994) v2(41,63.927)
  Bottom Layer w0.3: R34.2 U9.5
  Bottom Layer w0.5: v2(31,34.75) U6.10 ; R34.2 35.064,64.307 ccw(c35.98,65.223) 35.98,63.927 v2(41,63.927)
V5V: C6.1 C7.1 C19.1 C21.1 C22.1 R15.1 R16.1 R18.1 R25.1 R25.2 R30.2 U1.3 U4.14 U8.1 | length 57.8
  Top Layer w0.3: U1.3 27.25,69.692 ccw(c28.801,69.692) 27.704,68.596 28.493,67.807 cw(c26.976,66.29) 29.121,66.29 C7.1@29.121,63.614 ; C7.1 C7.1@29.121,63.614 ; R18.1@29.004,62.2 R18.1@29.004,62.4 ; R18.1 cw(c29.3,62.579) 29.121,62.579 C7.1@29.121,63.614 ; R18.1@29.5,62.6 37.515,62.6 ccw(c37.515,64.592) 39.507,64.592 C6.1
  Top Layer w0.4: C19.1@29.898,84.48 ccw(c29.898,85.998) 30.971,84.925 cw(c32.045,83.851) 32.045,85.369 32.294,85.369 ccw(c32.294,86.075) U8.1 ; R25.1 34.242,74.7 cw(c34.242,72.822) R16.1 R15.1 37.294,74.15 cw(c37.294,73.053) 38.07,73.829 ; 38.07,73.829 38.256,73.643 cw(c36.46,71.847) 39,71.847 ccw(c41.44,71.847) 39.715,70.122 40.758,69.078 cw(c39.877,68.198) 41.123,68.198 41.123,66.863 cw(c39.954,66.863) 39.954,65.694 C6.1
  Top Layer w0.6: R25.2 R30.2 cw(c27.363,77.749) 27.106,78.006 27.588,78.488 cw(c28.709,77.367) 28.709,78.952 29.5,78.952 C21.1 ; U4.14 C6.1
  Top Layer w1: C21.1 ccw(c29.258,80.242) 29.6,80.242 C19.1
  Top Layer w1.2: C22.1@27.952,83.5 C19.1@29.418,83.5
VGND: C6.2 C10.2 C12.2 C13.2 C14.1 C16.2 C19.2 C21.2 D1.1 D2.2 D10.1 R5.1 R7.2 R10.2 R31.2 R32.2 U2.8 U4.7 U8.2 U9.3 | length 35.4
  Top Layer w0.3: C10.2 25.4,75.109 25.85,75.559 R10.2 25.85,78.55 26.775,79.475 26.775,84.079 cw(c27.491,84.079) 26.985,84.585 27.389,84.989 cw(c28.14,84.238) 28.14,85.3 29.625,85.3 R32.2 ; C12.2@37.462,63.71 C12.2 37.462,67.523
  Top Layer w0.5: U4.7 30.49,70.84 ccw(c33.03,70.84) 33.03,68.3 35.893,68.3 cw(c35.893,66.593) 37.1,67.8 ccw(c38.32,69.02) 37.462,67.523 ccw(c38.32,69.02) 38.32,67.295 C6.2
  Top Layer w0.8: C6.2 v2@39.507,68.481
  Bottom Layer w0.5: v2(34.5,77.749) 35.928,76.322 cw(c35.101,75.495) 36.27,75.495 U9.3
  other v2: 39.507,68.565
  other v3: 34.5,92
Vin: C4.1 C5.1 R17.1 U2.7 U3.7 U7.9 | length 23.8
  Top Layer w0.2: R17.1 9.25,75.545 ccw(c9.51,75.545) 9.51,75.286 12.07,75.286 cw(c12.07,74.856) 12.5,74.856 U7.9
  Top Layer w2: v3(3.082,78.85) 3.424,78.507 ccw(c5.418,80.501) 5.418,77.682 v3(20.5,77.682)
Vin0: D3.2 pad.L@3.5,63.27 pad.L@3.5,72.75 R17.2 U7.8 U7.10 | length 40.6
  Top Layer w0.2: pad.L@3.5,72.75 pad.L@3.5,72.897 ; U7.10 12,74.828 9.489,74.828 ccw(c9.489,74.59) 9.25,74.59 R17.2 12.567,72.897 ccw(c12.567,73.33) 13,73.33 U7.8
  Top Layer w0.3: pad.L@3.5,61.93 pad.L@3.5,63.27
  Top Layer w0.5: pad.L@3.5,63.27 pad.L@6.549,66.319
  Top Layer w0.8: D3.2 10.504,63.646 v1(15.884,63.646)
  Top Layer w6: pad.L@3.5,63.27 pad.L@3.5,72.75
  Bottom Layer w6: pad.L@3.5,63.27 pad.L@3.5,72.75
VNEG: C7.2 C22.2 D10.2 R23.2 R33.2 U1.12 | length 33.8
  Top Layer w0.25: C22.2 25.1,82.684 cw(c23.932,82.684) 24.758,81.858 23.908,81.008 ccw(c25.326,79.59) 23.321,79.59 23.321,63.286 ccw(c23.948,63.286) 23.948,62.658 25.684,62.658 ccw(c25.684,63.766) 26.468,62.983 C7.2
  Top Layer w0.4: C7.2@27.25,63.614 U1.12
  Top Layer w0.5: C22.2@25.1,83.9 25.1,84.921 cw(c27.281,84.921) R33.2@25.739,86.464 ; R33.2@25.75,86.475 D10.2 R23.2
pads on no net: LOGO1. U2.4 U3.4 U4.4 U6.7 U6.11 U6.12 U6.17 U6.18 U6.19 U6.20 U6.21 U6.22 U6.24 U6.27 U6.28 U6.32
copper on no net: | length 16
  Top Layer w0.25: 0,1 0,0 1,0 ; 0,96 0,97 1,97 ; 49,0 50,0 50,1 ; 49,97 50,97 50,96
  Bottom Layer w0.25: 0,1 0,0 1,0 ; 0,96 0,97 1,97 ; 49,0 50,0 50,1 ; 49,97 50,97 50,96

## Polygon pours and split planes (outlines as drawn)
GND on Top Layer "GND_L01_P003" (solid, remove dead copper, pour order 3): 0,97 0,39.5 3.832,39.5 cw(c3.832,36.681) 5.826,38.674 9,35.5 50,35.5 50,97 12,97
E on Top Layer "E_L01_P000" (solid, remove dead copper, pour order 0): 4,34.502 30,33 50,33 50,17.251 50,0 0,0 0,34.502
VGND on Top Layer "VGND_L01_P001" (solid, remove dead copper, pour order 1): 37.338,93.5 cw(c37.338,92.332) 38.506,92.332 38.506,77.622 cw(c37.338,77.622) 37.338,76.454 25.095,76.454 cw(c25.095,77.622) 23.927,77.622 23.927,78.105 24.003,88.849 24.003,92.332 cw(c25.171,92.332) 25.171,93.5
GND on Bottom Layer "GND_L02_P002" (solid, remove dead copper, pour order 2): 0,97 0,39.5 3.832,39.5 cw(c3.832,36.681) 5.826,38.674 9,35.5 50,35.5 50,97 12,97

## Other copper
Top Layer:
  pour cut-out: 9.627,97.053 9.627,89.713 ccw(c11.557,89.713) 11.557,87.782 20.015,87.782 ccw(c20.015,89.433) 21.666,89.433 21.666,97.003 17.907,97.003
  region net Vin0: 11.055,68.081 ccw(c12.137,68.081) 11.372,67.317 11.647,67.042 cw(c10.82,66.216) 11.989,66.216 11.989,63.019 cw(c10.82,63.019) 11.647,62.193 9.588,60.134 cw(c8.762,60.96) 8.762,59.792 0.965,59.792 0.965,65.227 7.01,65.227 ccw(c7.01,65.634) 7.417,65.634 7.417,73.33 cw(c8.306,73.33) 8.306,74.219 11.055,74.219
  pour cut-out: 13.36,19.938 13.36,12.421 25.129,12.421 25.129,19.938
  text "BOOSTER" at 10.414,91.237 h1.52
  text "2026" at 12.344,88.849 h1.52
Bottom Layer:
  region net VGND: 40.234,78.943 cw(c40.234,77.775) 41.402,77.775 41.402,68.478 cw(c40.234,68.478) 40.234,67.31 39.472,67.295 38.913,67.295 cw(c38.913,68.311) 37.897,68.311 37.897,70.534 ccw(c36.728,70.534) 37.555,71.361 35.978,72.937 cw(c36.805,73.763) 35.636,73.763 35.636,74.802 ccw(c34.468,74.802) 35.294,75.628 33.515,77.407 cw(c34.341,78.233) 33.172,78.233 33.172,83.236 ccw(c32.004,83.236) 32.004,84.404 23.698,84.404 cw(c23.698,85.573) 22.53,85.573 22.53,92.735 cw(c22.962,92.735) 22.962,93.167 35.916,93.167 cw(c35.916,92.456) 36.627,92.456 36.627,80.112 ccw(c37.795,80.112) 37.795,78.943
  region net OUT2: 37.4,80.354 ccw(c38.1,80.354) 38.1,79.654 40.857,79.654 ccw(c40.857,80.264) 41.466,80.264 41.466,91.542 ccw(c40.298,91.542) 40.298,92.71 38.568,92.71 ccw(c38.568,91.542) 37.4,91.542
  region net GND: 16.205,81.712 16.205,74.854 ccw(c17.196,74.854) 17.196,73.863 17.653,73.863 ccw(c17.653,74.828) 18.618,74.828 18.618,82.042 17.12,82.042
  region net Vin: 19.19,78.626 19.19,77.931 ccw(c20.547,77.931) 20.547,76.574 24.25,76.574 ccw(c24.25,76.86) 24.536,76.86 24.536,79.731 ccw(c24.003,79.731) 24.003,80.264 19.736,80.264 ccw(c19.736,79.731) 19.202,79.731 19.202,79.324
  region net Vin: 2.953,80.264 ccw(c2.953,79.287) 1.975,79.287 1.975,78.797 ccw(c3.029,78.797) 3.029,77.744 7.831,77.744 cw(c7.831,76.574) 9,76.574 ccw(c9,76.86) 9.286,76.86 9.286,79.731 ccw(c8.753,79.731) 8.753,80.264
  pour cut-out: 39,67 38.27,67 38.27,64.576
  pour cut-out: 18.5,52.5 18.5,57 43.5,57 43.5,52.5 39,52.5
  pour cut-out: 18.5,39.5 18.5,35 43.5,35 43.5,39.5 39,39.5
Multi-Layer:
  pour cut-out: 43.158,55.017 43.158,35 50,35 50,57 43.158,57

## Silkscreen, mask and mechanical layers (free items; w line width, h text height)
Board Shape:
  the board outline again, w0.1